# Altium PCB PCB-MAIN.PcbDoc (part 3 of 6)
Units mm, origin at the board's own origin, x right, y up, seen from the top; angles counter-clockwise.
Board outline 110 x 75 mm, 8 copper layers (F.Cu, In1.Cu, In2.Cu, In3.Cu, In4.Cu, In5.Cu, In6.Cu, B.Cu); 251 components, 185 nets, 1143 pads, 853 vias.
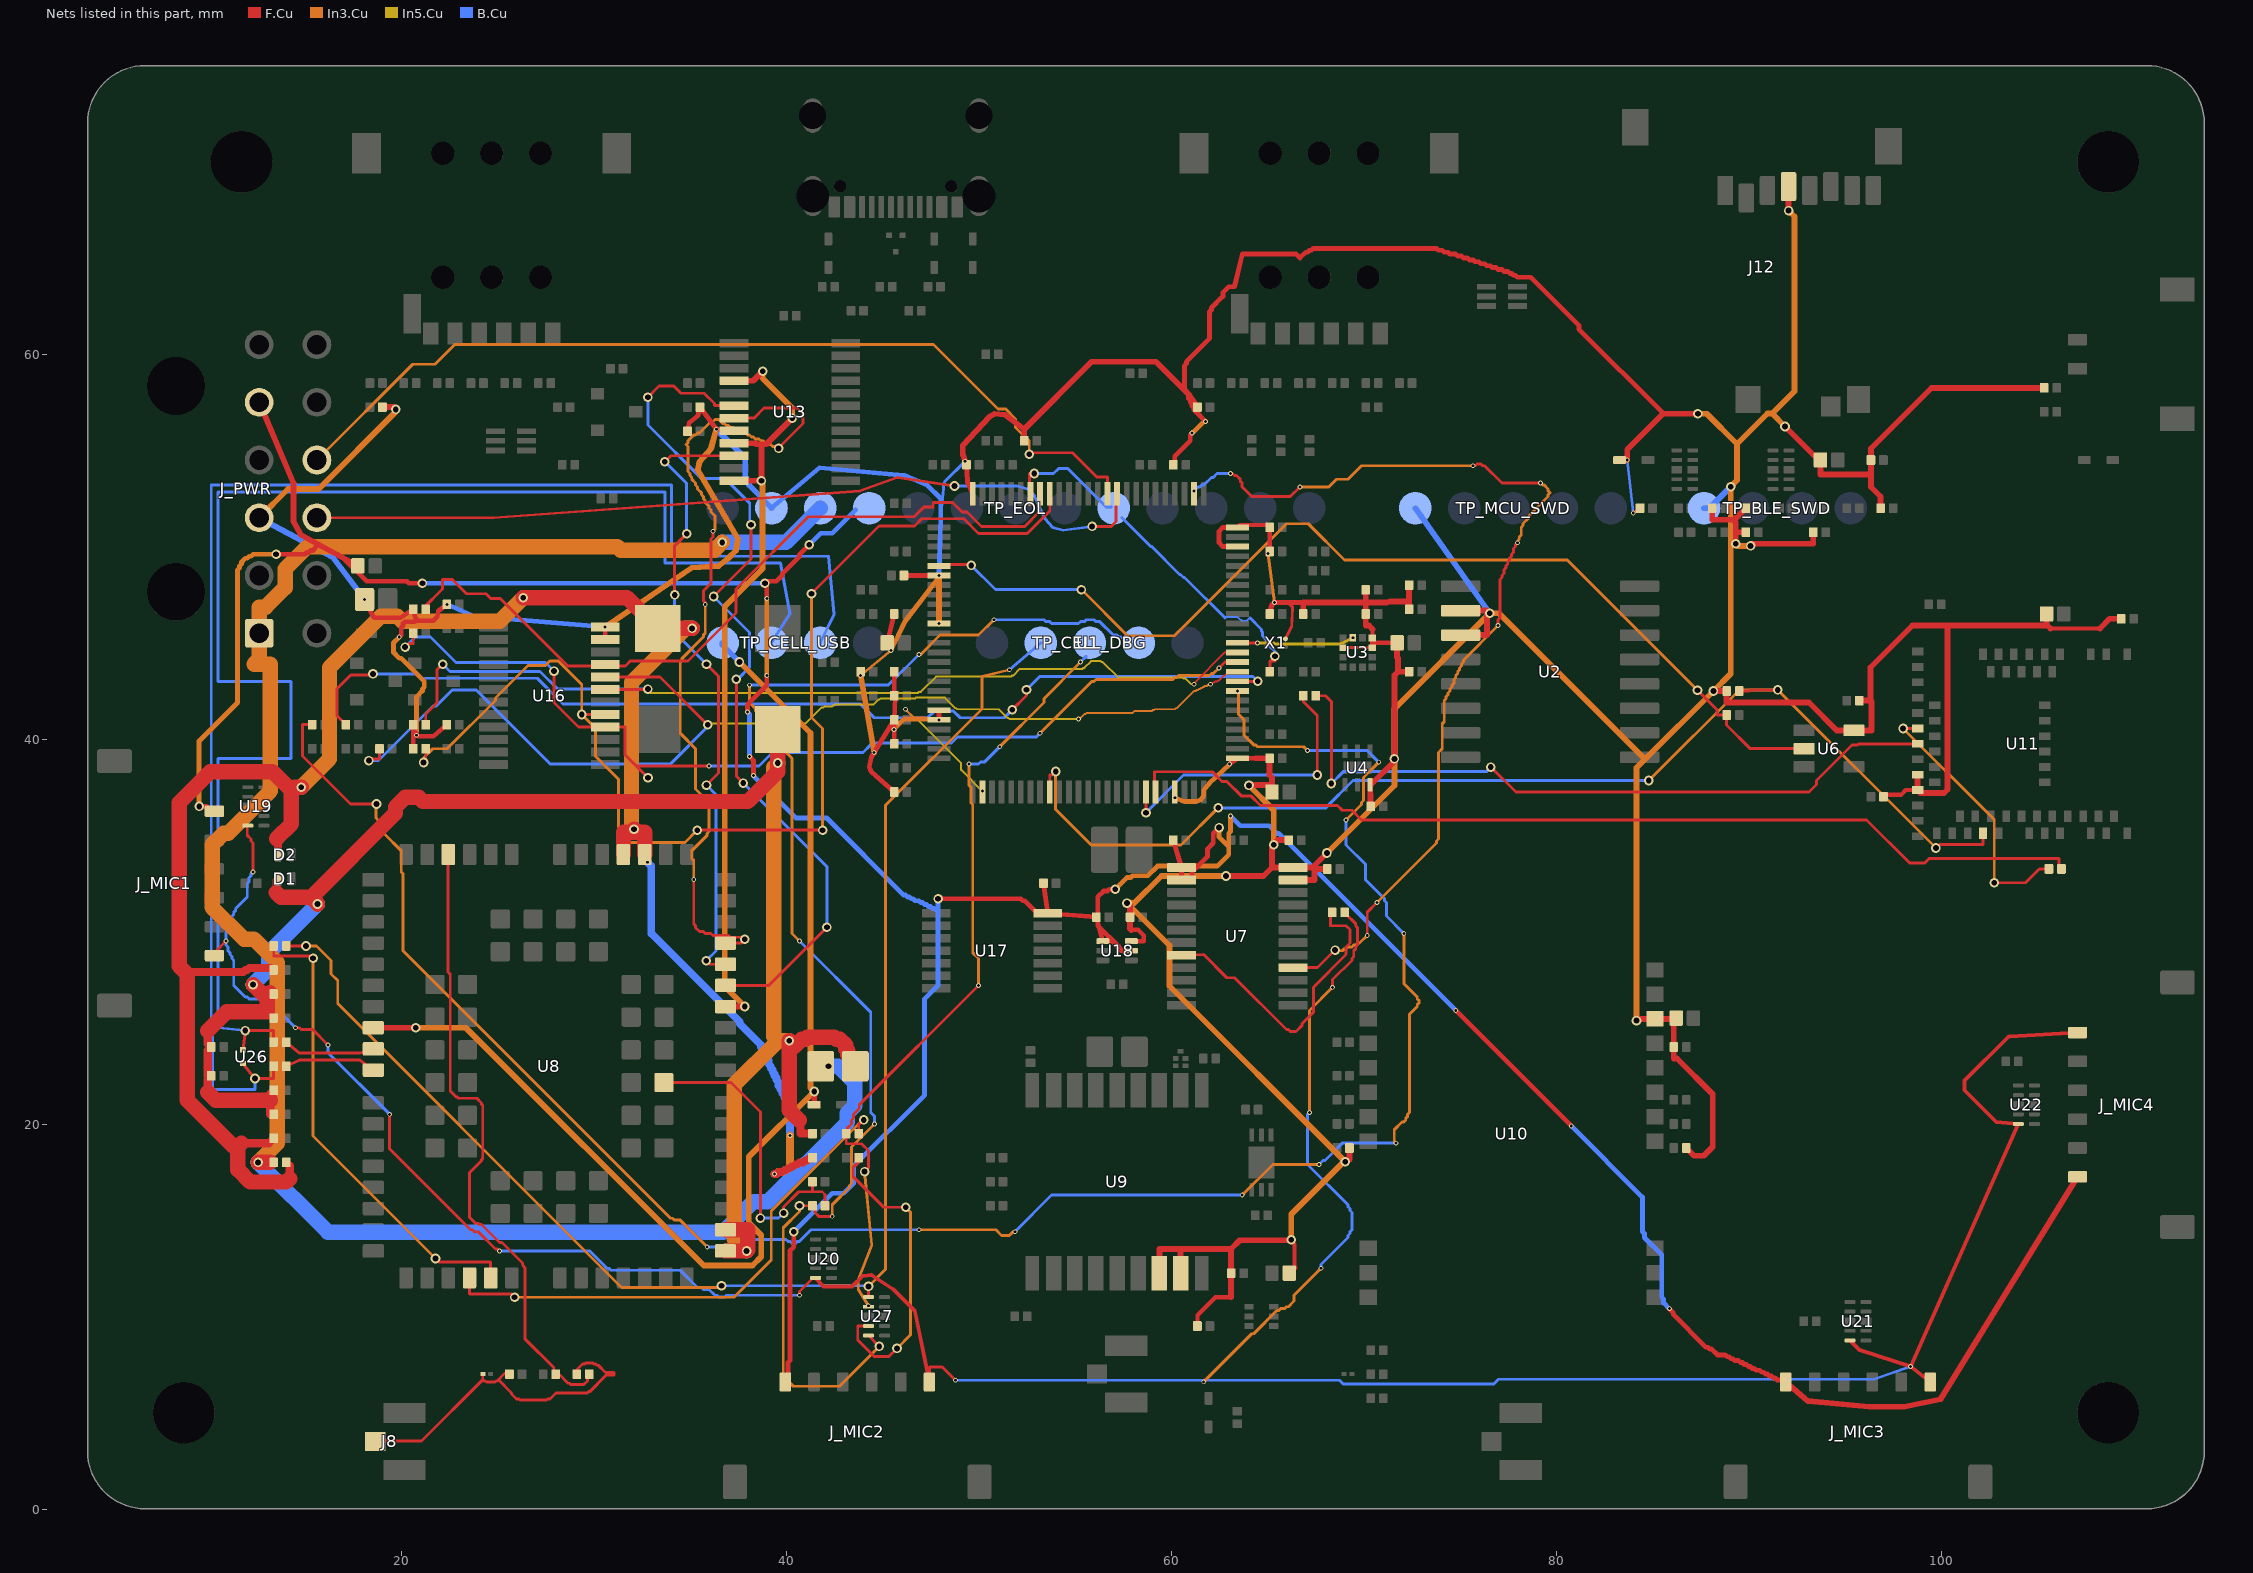
[diagram p8: the nets of this part, all layers, seen from the top]

## Via types
v1: diameter 0.5, hole 0.3, F.Cu to B.Cu, tented both sides, 579 vias
v2: diameter 0.25, hole 0.15, F.Cu to B.Cu, tented both sides, 274 vias

## Nets (pads, with @x,y where several pads share a name; then routed paths per layer and width w, separated by ;. In a path a pad name is that pad's centre, name@x,y a point inside that pad or via, vN(x,y) a via of type N, cw(c..) or ccw(c..) an arc to the next point about the centre after c; other vN are vias at no path point)
1V8_MIC: C20.1 C27.1 C30.1 C31.1 J_MIC1.1 J_MIC2.1 J_MIC3.1 J_MIC4.1 J_PWR.5 TP_EOL.4 U7.1 U7.2 U17.14 U18.1 U18.5 | length 207.4
  F.Cu w0.25: v1(9.485,36.525) 9.885,36.525 J_MIC1.1@9.985,36.425 ; v1(13.485,49.625) 14.985,49.625 15.085,49.725 15.185,49.725 15.285,49.825 15.385,49.825 15.685,50.125 ; 16.985,49.425 18.185,48.225 20.285,48.225 20.385,48.125 v1(21.085,48.125) ; v2(37.985,41.425) 37.985,41.825 38.985,42.825 v2(38.985,43.325) ; v2(38.085,39.125) 38.285,38.925 v2(38.285,38.125) ; v1(38.885,48.125) v1@38.985,48.225 ; v2(38.985,47.325) v1@38.985,48.225 ; J_MIC2.1@40.085,6.925 40.085,7.625 40.185,7.725 40.185,13.425 40.385,13.625 v1(40.385,14.425) ; v1(41.185,50.125) 40.685,49.625 40.685,49.525 39.785,48.625 39.785,48.525 39.485,48.225 v1@38.985,48.225 ; v1(47.885,31.725) 52.185,31.725 52.285,31.625 52.385,31.625 U17.14@52.985,31.025 ; C30.1@53.36,32.525 U17.14@53.585,30.975 C31.1@56.11,30.775 U18.1@56.445,29.525 56.945,29.525 57.445,29.025 U18.5@57.925,29.025 ; v1(57.085,32.225) 56.785,32.225 56.685,32.125 56.485,32.125 56.185,31.825 56.185,30.325 57.285,29.225 57.285,29.125 57.385,29.025 57.485,29.025 ; C27.1@60.11,34.775 U7.1@60.535,33.35 U7.2@60.535,32.7 ; U7.2@61.085,32.725 61.085,33.125 61.885,33.925 61.885,34.325 62.185,34.625 62.185,35.125 v1(62.485,35.425) ; v2(74.785,25.925) v2(80.785,19.925) ; v2(85.885,10.425) 86.085,10.225 86.085,10.125 87.785,8.425 87.885,8.425 87.985,8.325 88.085,8.325 88.385,8.025 88.785,8.025 88.885,7.925 88.985,7.925 89.085,7.825 89.185,7.825 89.285,7.725 89.485,7.725 89.585,7.625 89.685,7.625 89.785,7.525 89.885,7.525 89.985,7.425 90.085,7.425 90.185,7.325 90.285,7.325 90.385,7.225 90.585,7.225 90.685,7.125 90.785,7.125 90.885,7.025 90.985,7.025 91.085,6.925 91.185,6.925 91.285,6.825 91.385,6.825 91.485,6.725 91.685,6.725 J_MIC3.1@91.785,6.625
  F.Cu w0.3: J_PWR.5@12.605,57.525 14.385,53.325 14.385,51.325 14.785,50.625 C20.1@17.735,49.025 ; J_MIC3.1@91.935,6.615 93.085,5.625 96.285,5.325 98.085,5.325 99.985,5.725 J_MIC4.1@107.095,17.275
  In3.Cu w0.25: v1(9.485,36.525) 9.485,39.925 11.485,41.925 11.485,48.825 11.585,48.925 11.585,49.025 11.685,49.125 11.685,49.225 11.885,49.425 11.985,49.425 12.085,49.525 12.185,49.525 12.285,49.625 v1(13.485,49.625) ; v2(38.985,43.325) v2(38.985,47.325) ; v1(57.085,32.225) 57.685,32.825 57.885,32.825 57.985,32.925 58.785,32.925 59.285,33.425 62.385,33.425 62.985,34.025 62.985,34.425 ; v1(62.485,35.425) 62.485,34.925 62.985,34.425 ; v2(63.085,36.025) 63.085,35.225 62.985,35.125 62.985,34.425
  B.Cu w0.25: v1(21.085,48.125) v1(38.885,48.125) ; v2(37.985,41.425) 38.085,41.325 v2(38.085,39.125) ; v2(38.285,38.125) 40.485,35.925 42.085,35.925 46.085,31.925 46.185,31.925 46.285,31.825 46.385,31.825 46.485,31.725 46.585,31.725 46.685,31.625 46.885,31.625 46.985,31.525 47.085,31.525 47.185,31.425 47.285,31.425 47.385,31.325 47.485,31.325 47.585,31.225 47.685,31.225 47.785,31.125 47.885,31.125 ; v1(40.385,14.425) 42.385,16.425 42.985,16.425 43.485,16.925 43.485,17.825 47.185,21.525 47.185,26.525 47.885,27.225 v1(47.885,31.725) ; v1(41.185,50.125) 41.785,50.725 42.385,50.725 TP_EOL.4@43.585,51.925 ; v2(63.085,36.025) 63.585,35.525 65.085,35.525 65.485,35.125 65.585,35.125 v2(74.785,25.925) ; v2(80.785,19.925) 84.485,16.225 84.485,14.425 84.585,14.325 84.585,14.125 85.485,13.225 85.485,11.025 85.585,10.925 85.585,10.725 v2(85.885,10.425)
3V3_DIGITAL: C1.1 C2.1 C3.1 C4.1 C5.1 C6.1 C7.1 C8.1 C9.1 C10.1 C11.1 C12.1 C13.1 C19.1 C21.1 C22.1 C23.1 C24.1 C25.1 C26.1 C28.1 C29.1 C32.1 C34.1 C35.1 C49.1 C60.1 C61.1 C62.1 C66.1 C67.1 C71.1 C72.1 C73.1 C74.1 C75.1 D11.1 J12.4 J_PWR.3 R1.1 R4.1 R6.1 R7.1 R13.1 R14.1 R28.1 R32.1 R33.1 R44.1 R48.1 R49.1 R67.1 R68.1 R76.1 R78.1 R85.1 R86.1 R87.1 R88.1 R89.1 R90.1 R99.1 TP_BLE_SWD.1 TP_EOL.2 TP_MCU_SWD.1 U1.6 U1.11 U1.20 U1.21 U1.27 U1.47 U1.51 U1.73 U1.75 U1.100 U2.2 U2.3 U3.2 U3.9 U3.10 U4.3 U6.5 U7.23 U7.24 U9.7 U9.8 U10.9 U11.28 U11.30 U13.8 U16.23 U16.24 U18.6 X1.3 | length 470.8
  F.Cu w0.15: v2(43.86,43.325) R14.1@43.86,43.525 ; C6.1@45.235,45.025 v2(45.435,44.625) ; R1.1@65.11,46.525 65.31,47.025 65.41,47.075 66.11,47.075 66.31,46.875 66.26,45.875 X1.3@65.935,45.23 ; U3.2@68.922,44.775 U3.9@70.447,44.775 ; v2(84.01,51.775) R90.1@84.36,52.025
  F.Cu w0.225: U18.6@57.925,29.525 58.575,29.525 58.575,29.817 58.282,30.11 57.925,30.11 ; C62.1@61.36,9.525 61.36,10.09 62.295,11.025 63.11,11.025 ; U1.51@63.435,39.025 64.349,39.025 64.387,39.025 ; U1.75@63.435,51.025 63.56,51.15 64.985,51.15 C4.1@65.11,51.025 65.11,50.34 C12.1@65.11,49.775 ; v1@66.207,13.978 66.407,13.777 C61.1@66.407,12.548 ; v1@66.219,14.002 v1(66.231,14.002) ; U3.9@70.447,44.775 70.447,45.025 ; 70.46,45.737 70.46,45.288 U3.10@70.447,45.275 70.447,45.025 ; 71.2,47.124 71.31,47.124 71.36,47.175 ; C24.1@71.735,45.025 70.447,45.025 ; R78.1@97.01,37.125 97.921,37.125 98.171,37.375 U11.30@98.785,37.375 ; 105.684,45.774 108.26,45.774
  F.Cu w0.25: v2(18.085,47.275) 18.535,46.375 18.635,46.325 19.935,46.325 R32.1@20.61,46.775 20.71,46.325 20.86,46.175 ; v2(19.885,45.325) 19.985,45.425 19.985,45.825 20.085,45.925 20.085,46.025 20.185,46.125 20.685,46.125 20.785,46.225 20.86,46.175 ; R28.1@20.61,39.525 R33.1@20.61,40.775 20.66,40.425 ; v2(20.785,40.225) 20.785,40.325 20.66,40.425 ; C35.1@22.36,40.775 21.66,40.175 20.86,40.175 20.66,40.425 ; v2(22.36,47.025) 21.91,46.675 21.86,46.375 21.66,46.175 20.86,46.175 ; U16.23@30.585,45.2 v2(30.585,45.85) ; C49.1@34.86,56.025 34.96,56.475 35.41,56.825 R44.1@35.51,57.275 v2(36.36,56.125) U13.8@37.285,56.05 ; C6.1@45.235,45.025 C1.1@45.61,46.525 ; v2(45.585,40.525) C8.1@45.61,41.025 ; C2.1@45.61,37.275 44.41,38.325 44.31,38.575 44.41,39.075 C8.1@45.61,41.025 ; C10.1@45.61,39.775 C8.1@45.61,41.025 ; C11.1@45.61,43.525 C9.1@45.61,42.275 45.66,42.225 C8.1@45.61,41.025 ; C7.1@46.11,48.525 v2(47.935,48.525) ; v2(47.935,41.025) U1.20@47.935,41.525 ; C5.1@49.36,54.275 49.41,53.425 U1.100@49.685,52.775 ; R4.1@60.185,54.325 60.185,54.725 60.985,55.525 60.985,55.825 v2(61.085,55.925) ; R49.1@61.285,57.425 R49.1@61.285,57.025 ; v2(61.785,56.525) R49.1@61.285,57.025 ; v2(63.035,38.725) U1.51@63.435,39.025 ; U1.73@63.435,50.025 62.685,50.025 62.485,50.225 62.485,50.825 62.685,51.025 U1.75@63.435,51.025 ; v2(65.035,49.675) C12.1@65.11,49.775 ; R1.1@65.11,46.525 65.21,46.977 v2(65.36,47.127) 66.86,47.127 ; 85.585,56.925 81.185,61.325 81.185,61.525 78.685,64.025 77.985,64.025 77.885,64.125 77.785,64.125 77.685,64.225 77.585,64.225 77.485,64.325 77.285,64.325 77.185,64.425 76.985,64.425 76.885,64.525 76.685,64.525 76.585,64.625 76.385,64.625 76.285,64.725 76.085,64.725 75.985,64.825 75.785,64.825 75.685,64.925 75.485,64.925 75.385,65.025 75.185,65.025 75.085,65.125 74.885,65.125 74.785,65.225 74.485,65.225 74.385,65.325 74.185,65.325 74.085,65.425 73.885,65.425 73.785,65.525 67.385,65.525 67.285,65.425 67.185,65.425 67.085,65.325 66.985,65.325 66.685,65.025 66.485,65.225 63.685,65.225 63.285,63.525 62.985,63.525 62.685,63.225 62.685,63.025 62.085,62.425 62.085,62.325 61.985,62.225 61.985,60.825 60.785,59.625 60.785,59.525 60.685,59.425 60.685,58.225 60.785,58.125 60.785,58.025 60.885,57.925 60.885,57.725 60.985,57.625 60.985,57.525 61.085,57.425 61.085,57.325 61.185,57.225 61.185,57.125 R49.1@61.285,57.025
  F.Cu w0.3: R48.1@19.01,57.275 19.587,57.275 v1(19.704,57.158) ; C5.1@49.36,54.275 49.16,54.827 49.16,55.277 50.56,56.777 50.81,56.927 51.36,56.877 52.36,56.127 ; R6.1@52.36,55.525 52.36,56.127 ; v1(57.698,31.503) 57.825,31.377 57.86,31.377 C32.1@57.86,30.775 57.86,30.173 57.861,30.173 57.925,30.11 ; U9.7@59.385,12.275 59.385,13.527 60.485,13.527 ; U9.8@60.485,12.275 60.485,13.527 ; R49.1@61.36,57.275 60.955,57.877 59.205,59.627 55.86,59.627 52.36,56.127 ; v1(62.845,32.912) 64.795,32.912 65.233,33.35 ; 63.11,11.025 C60.1@63.11,12.275 63.11,13.527 ; v1(64.041,37.616) 64.062,37.638 C13.1@65.235,37.638 ; 64.387,39.025 64.533,39.025 C3.1@65.11,39.025 65.11,38.152 65.235,38.027 C13.1@65.235,37.638 ; C13.1@65.235,37.275 C13.1@65.235,37.638 ; C28.1@66.11,34.775 65.533,34.775 65.329,34.571 v1(65.329,34.533) 65.233,34.437 65.233,33.35 ; C61.1@66.135,12.275 C61.1@66.407,12.548 ; v1@66.219,14.002 66.207,13.99 66.207,13.978 63.561,13.978 63.11,13.527 ; U7.23@66.335,32.7 67.437,32.7 67.437,33.275 ; R13.1@66.86,46.525 66.86,47.127 70.11,47.127 ; v1(68.089,34.104) 67.335,33.351 ; C29.1@68.11,33.275 67.437,33.275 ; v1(69.042,18.059) 69.156,18.173 69.26,18.173 R67.1@69.26,18.775 ; C25.1@70.11,47.775 70.11,47.127 ; C26.1@70.36,36.525 70.36,37.127 70.335,37.152 U4.3@70.335,37.66 70.386,37.66 71.595,38.869 v1(71.595,38.995) 71.595,43.337 71.783,43.525 ; 70.46,45.737 70.274,45.923 70.11,45.923 C23.1@70.11,46.525 70.11,47.127 ; 71.2,47.124 71.197,47.127 70.11,47.127 ; 71.36,47.175 72.36,47.175 ; C24.1@71.735,45.025 71.735,44.273 71.783,44.225 71.783,43.525 ; R7.1@72.36,43.525 71.783,43.525 ; C21.1@72.36,46.775 72.36,47.175 ; C22.1@72.36,48.025 72.36,47.175 ; U2.3@75.035,45.43 76.412,45.43 v1@76.412,46.7 ; U2.2@75.035,46.7 v1@76.412,46.7 ; v1(76.555,46.56) 76.552,46.56 v1@76.412,46.7 ; D11.1@83.295,54.525 v2(83.695,54.525) 83.695,55.077 85.553,56.935 v1(87.368,56.935) ; v1(84.178,25.397) 84.245,25.397 84.333,25.485 U10.9@85.135,25.485 C67.1@85.937,25.485 ; C67.1@86.235,25.525 85.977,25.525 C67.1@85.937,25.485 ; R68.1@86.76,18.775 87.162,18.373 87.672,18.373 88.143,18.844 88.143,21.564 86.284,23.423 86.11,23.423 C66.1@86.11,24.025 86.11,25.312 C67.1@85.937,25.485 ; R86.1@88.11,52.025 88.11,51.423 89.206,51.423 89.232,51.397 ; v1(88.173,42.525) 88.283,42.525 R76.1@88.86,42.525 88.86,41.923 93.135,41.923 94.583,40.475 U6.5@95.485,40.475 96.387,40.475 96.387,41.975 96.337,42.025 ; v1(89.335,50.172) 89.337,50.174 89.337,50.775 ; R87.1@89.86,50.775 89.337,50.775 ; R89.1@89.86,52.025 89.232,51.397 ; v1(90.105,50.062) 90.216,50.173 93.36,50.173 R88.1@93.36,50.775 ; v1(91.894,56.268) 93.636,54.525 C75.1@93.735,54.525 93.735,53.773 96.36,53.773 ; v1(92.08,67.486) J12.4@92.08,68.735 ; C73.1@95.76,42.025 96.337,42.025 ; R85.1@96.86,52.025 96.86,52.627 96.36,53.127 96.36,53.773 ; R78.1@97.01,37.025 R78.1@97.01,37.125 ; U11.28@98.785,38.175 U11.30@98.785,37.375 98.937,37.223 100.159,37.223 100.337,37.402 100.337,45.923 ; R99.1@105.36,58.275 99.508,58.275 96.36,55.127 C74.1@96.36,54.525 96.36,53.773 ; C72.1@105.485,46.525 105.485,45.923 ; 105.684,45.774 105.536,45.923 105.485,45.923 ; 108.26,45.774 108.761,46.275 C71.1@109.36,46.275 ; 60.485,13.527 63.11,13.527 ; 65.233,33.35 U7.24@66.335,33.35 67.261,33.35 67.335,33.35 ; 67.335,33.35 67.437,33.35 67.437,33.275 ; 89.232,51.397 89.337,51.293 89.337,50.775 ; 96.337,42.025 96.337,43.741 98.518,45.923 100.337,45.923 ; 100.337,45.923 105.485,45.923
  In3.Cu w0.1: v2(46.185,41.575) 46.685,41.075
  In3.Cu w0.15: v2(43.86,43.325) v2(45.435,44.625) ; v2(65.035,49.675) v2(65.36,47.127)
  In3.Cu w0.25: v2(19.885,45.325) 19.585,45.025 19.585,44.525 19.885,44.225 19.985,44.225 21.185,43.025 21.185,42.725 21.085,42.625 21.085,42.525 20.785,42.225 v2(20.785,40.225) ; v2(45.435,44.625) 46.185,46.175 47.885,48.375 v2(47.935,48.525) ; v2(45.585,40.525) 46.135,41.075 46.335,41.075 47.235,41.075 v2(47.935,41.025) ; v2(60.185,36.975) 60.685,36.775 61.285,36.775 61.535,36.875 61.685,37.075 61.685,37.375 61.985,37.725 v2(63.035,38.725) ; v2(61.085,55.925) 61.685,56.525 v2(61.785,56.525)
  In3.Cu w0.3: J_PWR.3@12.605,51.525 14.105,53.025 15.696,53.025 19.704,57.034 v1(19.704,57.158) ; v2(30.585,45.85) 35.085,48.925 36.485,49.025 36.985,49.425 37.385,49.825 37.485,50.425 35.385,54.025 35.485,54.425 36.085,55.125 v2(36.36,56.125) ; v2(43.86,43.325) v2(44.562,39.322) ; v2(47.935,46.025) v2(47.935,48.525) ; v1(62.845,32.912) 59.488,32.912 58.079,31.503 v1(57.698,31.503) 59.91,29.291 59.91,27.188 68.96,18.138 v1@68.96,18.059 ; v1(64.041,37.616) 65.329,36.327 v1(65.329,34.533) ; v1(66.231,14.002) 66.231,15.33 v1@68.96,18.059 ; v1(68.089,34.104) 71.595,37.611 v1(71.595,38.995) 71.595,41.6 v1(76.555,46.56) 77.03,46.56 84.619,38.971 ; v1(69.042,18.059) v1@68.96,18.059 ; v1(84.178,25.397) 84.178,38.53 84.619,38.971 ; v1(87.368,56.935) 87.826,56.935 89.405,55.356 ; v1(90.105,50.062) 89.445,50.062 v1(89.335,50.172) 89.072,50.172 ; v1(91.894,56.268) 91.225,56.936 ; v1(92.08,67.486) 92.391,67.175 92.391,58.102 91.225,56.936 ; 84.619,38.971 v1(88.173,42.525) 89.072,43.424 89.072,50.172 ; 89.072,50.172 v1(89.072,53.139) 89.405,53.472 89.405,55.356 ; 89.405,55.356 90.986,56.936 91.225,56.936
  In5.Cu w0.1: v2(46.185,41.575) 46.735,41.025 46.835,41.025 49.085,38.775 49.085,38.425 v2(50.185,37.325)
  B.Cu w0.15: 48.025,51.525 48.185,53.325 48.235,53.425 v2(49.292,54.463) ; v2(83.695,54.525) v2(84.01,51.775)
  B.Cu w0.25: v2(22.36,47.025) 23.685,46.425 v2(30.585,45.85) ; TP_EOL.2@39.225,52.025 41.725,54.125 46.125,53.725 47.325,53.225 48.025,52.525 48.025,51.525 v2(47.935,48.525)
  B.Cu w0.3: J_PWR.3@12.605,51.525 16.435,49.475 v2(18.085,47.275) ; v2(36.36,56.125) 37.86,54.625 37.86,53.625 38.06,53.425 38.06,53.225 TP_EOL.2@39.225,52.025 ; TP_MCU_SWD.1@72.685,52.025 v1(76.555,46.56) ; TP_BLE_SWD.1@87.685,52.025 87.958,52.025 v1(89.072,53.139)
3V8_MODEM: FB1.1 J_PWR.1 R42.1 TP_EOL.3 | length 104.5
  F.Cu w0.4: R42.1@13.183,18.025 R42.1@13.36,18.025
  F.Cu w0.8: v1(12.549,18.025) R42.1@13.183,18.025
  In3.Cu w0.8: v1(12.549,18.025) 13.553,19.03 13.553,28.408 12.329,29.632 11.814,29.632 10.165,31.282 10.165,34.534 10.753,35.123 10.996,35.123 12.347,36.474 13.185,37.325 13.185,43.915 12.347,43.915 12.605,44.172 J_PWR.1@12.605,45.525 12.605,46.878 12.943,46.878 13.958,47.892 13.958,48.862 15.12,50.025 31.215,50.025 31.395,49.845 36.268,49.845 v1(36.666,50.243)
  B.Cu w0.8: v1(12.549,18.025) 16.173,14.401 36.714,14.401 38.299,15.986 39.039,15.986 43.165,20.112 43.165,20.589 43.555,20.979 43.555,22.156 42.685,23.025 v1(42.185,23.025) ; v1(36.666,50.243) 39.983,50.243 TP_EOL.3@41.765,52.025
3V8_MODEM_BB: C36.1 C37.1 C38.1 C39.1 C40.1 C41.1 C42.1 C43.1 D1.1 FB1.2 U8.32 U8.33 | length 93
  F.Cu w0.4: C37.1@9.934,22.35 C37.1@10.11,22.525 C37.1@9.935,22.525 ; C38.1@9.934,23.85 C38.1@10.11,24.025 C38.1@9.934,24.201 ; 13.022,25.863 C40.1@13.36,25.525 ; C39.1@13.184,21.6 C39.1@13.36,21.775 ; C41.1@13.185,20.525 C41.1@13.36,20.525 ; C43.1@13.227,26.775 C43.1@13.36,26.775 ; 40.661,20.224 40.733,20.152 40.733,19.525 C42.1@41.36,19.525
  F.Cu w0.401: 13.484,32.053 13.484,32.674 D1.1@13.585,32.775
  F.Cu w0.45: 9.934,21.673 C37.1@9.934,22.35 ; C37.1@9.934,22.525 C38.1@9.934,23.85 ; C38.1@9.934,24.201 9.934,24.877 ; C43.1@13.152,26.85 C43.1@13.227,26.775 ; C41.1@13.184,20.525 13.184,21.264 C39.1@13.184,21.6
  F.Cu w0.8: 9.934,21.673 10.343,21.264 13.184,21.264 ; 9.934,24.877 10.921,25.863 13.022,25.863 13.022,26.726 ; v1(12.283,27.268) 12.825,26.726 13.022,26.726 ; C43.1@13.152,26.85 13.028,26.726 13.022,26.726 ; 13.484,32.053 13.74,31.798 15.31,31.798 ; v1(15.636,31.451) 15.636,31.472 15.31,31.798 ; U8.32@36.835,13.425 v1(37.935,13.425) 37.987,13.477 37.987,14.525 U8.33@36.835,14.525 ; C36.1@39.555,40.525 v1(39.557,38.779) ; v1(39.557,38.779) v1(39.557,38.779) ; v1(40.145,24.346) 40.145,20.74 40.661,20.224 ; 40.385,24.025 40.785,24.425 40.985,24.425 41.085,24.525 42.485,24.525 42.585,24.425 42.785,24.425 43.085,24.125 43.085,23.925 43.185,23.825 FB1.2@43.185,23.625 ; 15.31,31.798 19.687,36.175 19.687,36.495 20.186,36.994 20.891,36.994 21.105,36.78 38.007,36.78 39.555,38.328 v1(39.557,38.779)
  In3.Cu w0.8: v1(37.935,13.425) 37.298,14.062 37.298,22.087 39.557,24.346 ; v1(39.557,38.779) 39.336,38.558 39.336,24.567 39.557,24.346 ; v1(40.145,24.346) 39.557,24.346
  B.Cu w0.8: v1(12.283,27.268) 13.088,28.072 13.088,28.901 v1(15.636,31.451) v1(15.636,31.451)
3V8_MODEM_RF: C44.1 C45.1 C46.1 C47.1 D2.1 R42.2 U8.52 U8.53 | length 107.6
  F.Cu w0.4: 9.085,27.925 11.785,27.925 11.885,28.025 11.985,28.025 12.085,28.125 13.185,28.125 C47.1@13.285,28.025 ; 13.11,19.025 C45.1@13.36,19.275 ; R42.2@14.01,18.025 R42.2@14.185,17.85 ; v2(39.385,17.425) 39.485,17.425 39.585,17.525 39.785,17.525 39.885,17.625 39.985,17.625 40.085,17.725 40.185,17.725 40.285,17.825 40.385,17.825 40.485,17.925 40.585,17.925 40.685,18.025 40.885,18.025 40.985,18.125 41.085,18.125 41.185,18.225 C46.1@41.285,18.225
  F.Cu w0.401: 13.511,34.851 13.585,34.777 D2.1@13.585,34.025
  F.Cu w0.45: 11.685,19.025 13.11,19.025 ; 14.185,17.173 R42.2@14.185,17.85
  F.Cu w0.8: 11.685,19.025 11.496,18.836 ; 13.511,34.851 14.275,35.615 14.275,37.351 ; 14.185,17.173 14.019,17.007 12.139,17.007 11.496,17.65 11.496,18.836 ; v1(14.795,37.527) 14.451,37.527 14.275,37.351 ; v1(26.328,47.373) 31.717,47.373 C44.1@33.315,45.775 v1(35.102,45.775) ; U8.53@31.535,34.025 31.535,35.177 v1@32.085,35.177 ; v1(32.085,35.338) v1@32.085,35.177 ; U8.52@32.635,34.025 32.635,35.177 v1@32.085,35.177 ; 11.496,18.836 11.295,18.836 8.876,21.255 8.876,27.802 8.445,28.233 8.445,36.708 10.071,38.335 13.291,38.335 14.275,37.351
  In3.Cu w0.4: v2(39.385,17.425) 39.485,17.425 39.585,17.525 39.785,17.525 39.885,17.625 39.985,17.625 40.185,17.825 v2(40.185,19.425)
  In3.Cu w0.8: v1(14.795,37.527) 16.26,38.992 16.26,43.746 18.926,46.412 19.778,46.412 20.038,46.153 25.108,46.153 v1(26.328,47.373) ; v1(32.085,35.338) 31.954,35.469 31.954,38.395 31.953,38.397 31.953,42.975 34.753,45.775 v1(35.102,45.775)
  B.Cu w0.4: v2(32.785,33.625) 32.985,33.425 32.985,29.925 37.585,25.325 37.585,25.225 38.685,24.125 38.685,24.025 38.785,23.925 38.785,23.825 38.885,23.725 38.885,23.625 38.985,23.525 38.985,23.425 39.085,23.325 39.085,23.125 39.185,23.025 39.185,22.925 39.285,22.825 39.285,22.725 39.385,22.625 39.385,22.525 39.485,22.425 39.485,22.325 39.585,22.225 39.585,22.025 39.685,21.925 39.685,21.825 39.785,21.725 39.785,21.625 39.885,21.525 39.885,21.425 39.985,21.325 39.985,21.225 40.085,21.125 40.085,20.925 40.185,20.825 v2(40.185,19.425)
AAD_CFG: U1.77 U7.16 | length 52.4
  F.Cu w0.15: v2(63.085,53.825) 63.185,53.825 63.285,53.725 63.385,53.725 63.585,53.525 63.585,53.425 63.685,53.325 63.685,53.125 64.185,52.625 66.185,52.625 v2(66.685,53.125) ; U7.16@66.335,28.15 67.604,28.15 v1(68.513,29.059) ; v2(70.185,29.825) 70.185,31.025 v2(70.685,31.525) ; v2(75.685,54.225) 75.785,54.225 75.885,54.325 76.085,54.325 76.185,54.225 76.285,54.225 77.185,53.325 v2(79.185,53.325) ; v2(76.985,45.925) 76.985,46.225 77.085,46.325 77.085,48.325 77.185,48.425 77.185,48.525 77.285,48.625 77.285,48.825 77.385,48.925 77.385,49.025 77.485,49.125 77.485,49.225 77.585,49.325 77.585,49.425 77.685,49.525 77.685,49.625 77.785,49.725 77.785,49.925 77.885,50.025 77.885,50.125 v2(77.985,50.225)
  In3.Cu w0.15: v2(66.685,53.125) 68.185,53.125 68.585,53.525 69.185,53.525 69.885,54.225 v2(75.685,54.225) ; v1@68.585,29.025 68.885,29.025 68.985,29.125 69.085,29.125 69.185,29.225 69.385,29.225 69.485,29.325 69.585,29.325 69.685,29.425 69.785,29.425 v2(70.185,29.825) ; v2(70.685,31.525) 73.785,34.625 73.785,34.725 73.885,34.825 73.885,39.325 74.085,39.525 74.085,40.825 74.185,40.925 74.185,42.025 74.285,42.125 74.285,42.225 74.385,42.325 74.385,42.425 74.485,42.525 74.485,42.625 74.585,42.725 74.585,42.825 74.685,42.925 74.685,43.125 74.785,43.225 74.785,43.325 74.885,43.425 74.885,43.525 74.985,43.625 74.985,43.725 75.085,43.825 75.085,43.925 75.185,44.025 75.185,44.125 v2(76.985,45.925) ; v2(77.985,50.225) 77.985,50.325 78.085,50.425 78.085,50.525 78.185,50.625 78.185,51.025 78.285,51.125 78.285,51.225 78.585,51.525 78.585,51.625 79.585,52.625 79.585,52.725 79.685,52.825 79.585,52.925 79.585,53.025 79.385,53.225 79.285,53.225 v2(79.185,53.325)
  B.Cu w0.15: v2(61.185,52.925) 61.385,53.125 61.485,53.125 61.585,53.225 61.685,53.225 62.085,53.625 62.185,53.625 62.385,53.825 v2(63.085,53.825)
AAD_CFG_1V8_FANOUT: J_MIC1.6 J_MIC2.6 J_MIC3.6 J_MIC4.6 R18.2 U19.5 U20.5 U21.5 U22.5 | length 170.6
  F.Cu w0.15: J_MIC1.6@10.385,28.925 10.385,29.025 v2(10.885,29.525) ; U19.5@11.985,35.525 11.985,35.025 12.185,34.825 12.185,34.725 12.285,34.625 v2(12.285,33.125) ; v2(14.485,25.025) 14.685,25.025 14.785,24.925 15.385,24.925 v2(16.185,24.125) ; v2(19.385,20.525) 19.385,18.725 23.585,14.525 23.685,14.525 23.785,14.425 23.985,14.425 24.885,13.525 24.985,13.525 v2(25.085,13.425) ; v2(40.685,11.125) 40.685,11.325 U20.5@41.385,12.025 ; J_MIC2.6@47.435,6.615 47.435,7.392 48.096,7.392 v2(48.783,6.705) ; v2(68.385,27.125) 68.385,27.525 69.385,28.525 69.385,28.625 69.485,28.725 69.485,29.025 69.585,29.125 69.585,29.225 69.685,29.325 69.685,30.225 69.585,30.325 69.585,30.425 R18.2@69.085,30.925
  F.Cu w0.2: U20.5@41.517,12.025 41.917,11.575 43.418,11.575 43.967,12.125 44.417,12.175 45.567,11.425 46.667,10.325 J_MIC2.6@47.435,6.615 ; U21.5@95.267,8.775 95.767,8.275 v2(98.417,7.425) ; J_MIC3.6@99.435,6.615 v2(98.417,7.425) ; J_MIC4.6@107.095,24.775 103.567,24.575 103.467,24.525 101.217,22.275 101.217,21.775 102.867,20.125 U22.5@104.017,20.025 v2(98.417,7.425)
  In3.Cu w0.15: v2(61.685,6.625) 64.185,9.125 64.285,9.125 65.485,10.325 65.585,10.325 65.685,10.425 65.885,10.425 65.985,10.525 66.085,10.525 66.385,10.825 66.385,11.125 v2(67.785,12.525) ; v2(67.185,20.625) 67.185,25.925 v2(68.385,27.125)
  B.Cu w0.15: v2(12.285,33.125) 12.185,33.025 12.185,32.925 12.085,32.825 12.085,32.625 11.985,32.525 11.985,31.825 11.385,31.225 11.385,31.125 11.285,31.025 11.285,30.925 11.185,30.825 11.185,30.725 11.085,30.625 11.085,30.425 10.985,30.325 10.985,30.225 10.885,30.125 v2(10.885,29.525) 10.885,29.325 10.985,29.225 10.985,29.025 11.085,28.925 11.085,28.825 11.185,28.725 11.185,28.625 11.285,28.525 11.285,27.225 11.885,26.625 11.985,26.625 12.085,26.525 12.985,26.525 v2(14.485,25.025) ; v2(16.185,24.125) 16.185,23.725 v2(19.385,20.525) ; v2(25.085,13.425) 29.785,13.425 30.685,12.525 30.785,12.525 30.885,12.425 34.485,12.425 35.385,11.525 35.585,11.525 35.685,11.425 35.985,11.425 36.285,11.125 36.385,11.125 36.485,11.025 36.785,11.025 36.885,11.125 v2(40.685,11.125) ; v2(48.783,6.705) 68.735,6.705 68.919,6.521 76.776,6.521 77.012,6.757 96.516,6.757 v2(98.417,7.425) ; 61.585,6.705 v2(61.685,6.625) ; v2(67.185,20.625) 67.085,20.525 67.085,17.925 69.185,15.825 69.185,15.725 69.285,15.625 69.285,15.525 69.385,15.425 69.385,14.525 69.285,14.425 69.285,14.325 69.185,14.225 69.185,14.125 67.785,12.725 v2(67.785,12.525)
AAD_CFG_1V8_U7: R18.1 U7.8 | length 15.7
  F.Cu w0.15: U7.8@60.535,28.8 61.685,28.825 62.885,27.625 63.285,27.625 65.985,24.925 66.085,24.925 66.185,24.825 66.485,24.825 66.785,25.125 66.785,25.225 67.385,25.825 67.385,27.125 69.085,28.825 69.085,29.225 69.285,29.425 69.285,30.125 69.085,30.325 68.385,30.325 68.285,30.325 R18.1@68.285,30.925
ACCEL_INT: U1.63 U3.12 | length 5.6
  F.Cu w0.15: U1.63@63.885,45.025 v2(64.485,45.025)
  In5.Cu w0.15: v2(64.485,45.025) 65.335,45.025 65.385,44.975 68.785,44.975 68.835,45.025 68.935,45.025 68.985,45.075 69.035,45.075 69.085,45.125 69.135,45.125 69.185,45.175 69.235,45.175 69.285,45.225 v2@69.335,45.225
  other v2: 69.435,45.288
BLE_DFU_REQ: R76.2 U1.34 U11.39 | length 61.6
  F.Cu w0.15: U1.34@53.685,37.275 53.685,38.152 53.806,38.152 v1(53.993,38.339) ; R76.2@89.51,42.525 90.012,42.525 90.067,42.58 v1(91.517,42.58) ; v1(99.735,34.363) 99.921,34.548 102.185,34.548 U11.39@102.185,35.125
  In3.Cu w0.15: v1(53.993,38.339) 53.993,36.367 55.847,34.513 60.503,34.513 v1(62.442,36.452) ; v1(84.813,37.87) 89.523,42.58 v1(91.517,42.58) v1(99.735,34.363)
  B.Cu w0.15: v1(62.442,36.452) 68.027,36.452 69.445,37.87 v1(84.813,37.87)
BLE_EN: R77.1 U1.5 U6.2 | length 54.2
  F.Cu w0.15: U1.5@47.935,49.025 48.008,49.098 49.558,49.098 v1(49.607,49.05) ; v1(87.345,42.563) 88.358,41.55 88.358,41.275 R77.1@88.86,41.275 88.86,40.748 90.083,39.525 U6.2@92.885,39.525
  In3.Cu w0.15: v1(55.33,47.79) 57.726,45.394 60.168,45.394 65.987,51.213 67.115,51.213 69.001,49.327 80.581,49.327 v1(87.345,42.563)
  B.Cu w0.15: v1(49.607,49.05) 50.867,47.79 v1(55.33,47.79)
BLE_RX_U1: R74.2 U1.45 | length 50.8
  F.Cu w0.15: U1.45@59.185,37.275 59.135,37.325 59.135,38.325 62.135,38.325 62.635,37.825 62.885,37.825 63.635,37.075 64.135,37.075 64.635,36.575 68.635,36.575 68.885,36.325 69.385,36.325 69.885,35.825 96.135,35.825 98.385,33.575 99.135,33.575 99.385,33.825 106.135,33.825 106.135,33.325 106.185,33.275 R74.2@106.26,33.275
BLE_RX_U11: R74.1 U11.22 | length 13.9
  F.Cu w0.15: v1(98.028,40.575) U11.22@98.785,40.575 ; v1(102.765,32.556) 104.389,32.556 105.108,33.275 R74.1@105.61,33.275
  In3.Cu w0.15: v1(98.028,40.575) 102.765,35.838 v1(102.765,32.556)
BLE_TX_U1: R75.1 U1.44 | length 15.2
  F.Cu w0.15: v1(58.685,36.199) U1.44@58.685,37.275 ; R75.1@66.86,42.275 66.86,41.985 67.589,41.256 v1(67.589,38.157)
  B.Cu w0.15: v1(58.685,36.199) 60.642,38.157 v1(67.589,38.157)
BLE_TX_U11: R75.2 U11.24 | length 37.7
  F.Cu w0.15: R75.2@67.51,42.275 68.012,42.275 68.32,41.968 v1(68.32,37.715) ; v1(76.606,38.568) 77.908,37.267 93.139,37.267 93.535,37.663 93.535,37.875 95.379,39.719 95.65,39.719 95.706,39.775 U11.24@98.785,39.775
  B.Cu w0.15: v1(68.32,37.715) 68.936,38.331 76.369,38.331 v1(76.606,38.568)
BOOT0: R2.1 TP_EOL.9 U1.94 | length 18.6
  F.Cu w0.15: U1.94@52.685,52.775 52.635,52.825 52.635,53.825 v1(52.885,53.825) ; R2.1@65.11,43.525 65.135,43.55 65.135,43.575 65.135,44.075 65.385,44.075 v1(65.385,44.325)
  B.Cu w0.1: 62.835,46.375 63.435,46.375 63.585,46.225 63.635,46.225 63.685,46.175 63.935,46.175 64.035,46.275
  B.Cu w0.15: v1(52.885,53.825) 53.885,53.825 54.135,54.075 54.635,54.075 56.635,52.075 TP_EOL.9@56.885,52.075 ; TP_EOL.9@57.435,51.525 58.935,50.025 58.985,50.025 60.435,48.575 60.485,48.575 60.635,48.425 60.685,48.425 62.785,46.325 ; 64.085,46.325 64.685,45.725 64.685,45.625 64.735,45.575 64.735,45.375 64.935,45.175 64.935,45.025 65.085,44.875 ; 65.135,44.825 65.385,44.575 v1(65.385,44.325)
CELL_DBG_RXD_TP: R37.1 TP_CELL_DBG.3 U27.2 | length 41
  F.Cu w0.15: R37.1@43.11,19.525 43.11,18.998 43.904,18.998 44.262,18.64 44.262,17.747 v1(44.065,17.55) ; R37.1@43.185,19.625 43.185,19.825 43.385,20.025 43.385,20.225 43.485,20.325 43.485,20.525 43.785,20.825 43.785,21.025 v2(49.985,27.225) ; U27.2@44.267,10.525 v2(44.267,10.575)
  In3.Cu w0.15: v1(44.065,17.55) 44.435,13.725 43.735,11.925 43.735,11.425 v2(44.267,10.575) ; v2(49.485,38.725) 49.485,37.625 49.585,37.525 49.585,36.725 49.685,36.625 49.685,28.925 49.985,28.625 v2(49.985,27.225) ; v2(51.085,39.625) 53.385,41.925 53.385,42.125 v2(55.285,44.025)
  B.Cu w0.15: v2(49.485,38.725) 49.985,38.725 50.085,38.825 50.285,38.825 v2(51.085,39.625) ; v2(55.285,44.025) TP_CELL_DBG.3@55.585,44.325
CELL_DBG_RXD_U8: R37.2 U8.22 | length 27.5
  F.Cu w0.15: U8.22@23.535,12.025 23.535,11.198 25.703,11.198 v1(25.879,11.022) ; R37.2@43.76,19.525 43.76,20.052 43.832,20.052 v1(44.016,20.236)
  In3.Cu w0.15: v1(25.879,11.022) 37.276,11.022 39.217,12.963 39.217,15.5 43.953,20.236 v1(44.016,20.236)
CELL_DBG_TXD_TP: R36.2 TP_CELL_DBG.2 U27.1 | length 77.1
  F.Cu w0.15: R36.2@14.01,29.275 v1(15.036,29.275) ; U27.1@44.267,11.025 v1(44.267,11.585)
  In3.Cu w0.15: v1(15.036,29.275) 15.576,29.275 16.334,28.517 16.334,27.824 16.685,27.474 16.685,26.279 23.062,19.902 23.062,19.893 31.432,11.523 36.531,11.523 v1(36.626,11.618) ; v1(44.267,11.585) 45.153,12.471 45.153,36.588 50.159,41.594 50.159,43.275 v2(51.585,43.625)
  B.Cu w0.15: v1(36.626,11.618) 44.235,11.618 v1(44.267,11.585) ; v2(51.585,43.625) TP_CELL_DBG.2@53.225,45.025
CELL_DBG_TXD_U8: R36.1 U8.23 | length 24.6
  F.Cu w0.15: R36.1@13.36,29.275 13.36,28.748 15.298,28.748 v1(15.405,28.641) ; v1(21.77,13.033) 21.95,12.852 24.635,12.852 U8.23@24.635,12.025
  In3.Cu w0.15: v1(15.405,28.641) 15.405,19.397 v1(21.77,13.033)
CELL_DBG_VREF_TP: R41.2 U27.4 | length 16.1
  F.Cu w0.15: R41.2@43.76,18.275 43.76,18.058 43.475,17.773 43.475,17.282 45.064,15.693 v1(46.2,15.693) ; U27.4@44.267,9.525 43.708,9.525 43.708,8.796 44.565,7.939 45.323,7.939 v1(45.747,8.363)
  In3.Cu w0.15: v1(45.747,8.363) 46.456,9.072 46.456,15.437 v1(46.2,15.693)
CELL_DTR_U16: R29.1 U1.61 U16.16 | length 51.7
  F.Cu w0.15: v1(20.188,44.803) 20.383,44.998 20.61,44.998 R29.1@20.61,45.525 ; v1(27.926,43.558) 27.926,41.926 29.202,40.65 29.558,40.65 U16.16@30.585,40.65 31.612,40.65 31.612,39.207 v1(32.809,38.01) ; 32.185,38.625 v2(35.985,38.625) ; v2(62.485,43.725) 62.785,44.025 U1.61@62.985,44.025
  In3.Cu w0.15: v2(53.185,40.325) 55.885,43.025 55.985,43.025 56.085,43.125 60.085,43.125 60.185,43.225 60.285,43.225 60.385,43.325 61.985,43.325 62.085,43.425 62.185,43.425 v2(62.485,43.725)
  B.Cu w0.15: v1(20.188,44.803) 20.712,45.327 21.503,45.327 22.83,44 27.484,44 v1(27.926,43.558) ; v2(35.985,38.625) 38.585,38.625 39.285,39.325 43.985,39.325 44.385,39.725 44.485,39.725 44.585,39.825 48.585,39.825 48.885,40.125 52.985,40.125 v2(53.185,40.325)
CELL_PWRKEY_CMD: R24.1 U1.58 | length 108.3
  F.Cu w0.15: R24.1@15.36,40.775 14.858,40.775 14.858,39.147 17.356,36.649 v1(18.698,36.649)
  In3.Cu w0.15: v1@18.685,36.525 18.685,35.925 18.785,35.825 18.785,35.725 18.885,35.625 18.885,35.525 18.985,35.425 18.985,35.325 19.085,35.225 19.085,35.125 19.985,34.225 19.985,33.125 20.085,33.025 20.085,29.025 33.985,15.125 34.085,15.125 34.185,15.025 34.485,15.025 v2(35.885,13.625) ; v2(46.885,14.525) 50.885,14.525 51.185,14.225 51.585,14.225 51.785,14.425 v2(51.885,14.425) ; v2@63.485,42.425 63.485,41.325 63.785,41.025 63.785,40.225 64.285,39.725 64.385,39.725 64.485,39.625 66.885,39.625 v2(67.085,39.425) ; v2(63.685,16.325) 65.285,17.925 v2(67.685,17.925) ; v2(69.085,35.825) 69.885,36.625 69.885,36.725 69.985,36.825 69.985,38.025 v2(70.785,38.825) ; v2(71.685,19.025) 71.585,19.125 71.585,19.725 71.985,20.125 72.085,20.125 72.185,20.225 72.185,20.325 72.285,20.425 72.285,20.525 72.385,20.625 72.385,25.725 72.785,26.125 72.785,26.225 72.885,26.325 72.885,26.425 72.785,26.525 72.785,26.625 72.085,27.325 v2(72.085,29.925)
  B.Cu w0.15: v2(35.885,13.625) 36.685,13.625 36.785,13.725 36.985,13.725 37.085,13.825 37.185,13.825 37.385,14.025 39.985,14.025 40.085,13.925 40.185,13.925 40.285,13.825 40.485,13.825 40.585,13.925 40.685,13.925 41.285,14.525 v2(46.885,14.525) ; v2(51.885,14.425) 53.785,16.325 v2(63.685,16.325) ; v2(67.085,39.425) 70.185,39.425 v2(70.785,38.825) ; v2(67.685,17.925) 67.885,18.125 67.985,18.125 68.885,19.025 v2(71.685,19.025) ; v2(69.085,35.825) 69.085,34.525 70.085,33.525 70.085,32.725 71.085,31.725 71.085,31.625 71.185,31.525 71.185,30.825 v2(72.085,29.925)
  other v2: 63.435,42.525
CELL_RESET_N_CMD: R26.1 U1.59 | length 53.7
  F.Cu w0.15: R26.1@17.11,40.775 16.649,41.236 16.649,42.64 17.367,43.358 18.467,43.358 v1(18.521,43.413) ; v1(51.737,41.548) 52.477,42.288 v1(52.477,42.584) ; U1.59@63.435,43.025 64.312,43.025 64.313,43.026 v1(64.491,43.026)
  B.Cu w0.15: v1(18.521,43.413) 20.836,43.413 21.062,43.186 27.055,43.186 28.387,41.855 43.844,41.855 44.567,41.131 47.335,41.131 47.685,41.475 48.685,41.475 49.035,41.131 51.321,41.131 v1(51.737,41.548) ; v1(52.477,42.584) 53.166,43.273 64.244,43.273 v1(64.491,43.026)
CELL_RF: C79.1 R43.1 U8.60 | length 33.1
  F.Cu w0.151: U8.60@22.41,34.05 22.41,27.925 22.535,27.8 22.535,21.738 22.847,21.425 22.91,21.425 22.972,21.362 23.91,21.362 24.16,21.113 24.16,21.05 24.222,20.988 24.222,18.238 24.16,18.175 24.16,18.113 23.535,17.488 23.535,15.175 23.847,14.863 23.972,14.863 24.035,14.8 24.16,14.8 25.097,13.863 25.222,13.863 26.285,12.8 26.285,12.738 26.347,12.675 26.347,12.613 26.41,12.55 26.41,8.863 27.91,7.362 27.91,7.175 28.035,7.05 28.16,7.05 28.66,6.55 28.722,6.55 28.785,6.488 29.472,6.488 29.66,6.675 29.66,6.925 R43.1@29.785,7.05
CELL_RF_ANT: C80.1 D3.1 J8.1 R43.2 | length 18.4
  F.Cu w0.151: J8.1@18.66,3.55 21.035,3.55 24.222,6.737 ; D3.1@24.222,7.05 24.222,6.737 ; 25.035,6.737 25.722,6.05 25.722,5.988 25.972,5.738 26.097,5.738 26.16,5.675 27.535,5.675 27.597,5.738 27.722,5.738 28.035,6.05 29.66,6.05 29.722,6.112 29.785,6.112 30.66,6.988 31.035,6.988 31.035,7.113 30.597,7.113 30.222,7.488 30.16,7.488 30.097,7.55 29.972,7.55 29.91,7.613 29.597,7.613 29.535,7.55 29.41,7.55 29.097,7.238 R43.2@29.097,7.05 ; C80.1@25.598,7.05 25.347,7.05 24.973,6.675 24.91,6.675 24.847,6.613 24.41,6.613 24.348,6.675 24.285,6.675 24.222,6.737
CELL_RI_U16: R33.2 U1.62 U16.19 | length 48.9
  F.Cu w0.1: v2(61.185,42.875) 61.185,42.925 62.785,44.525 U1.62@62.985,44.525
  F.Cu w0.15: R33.2@21.26,40.775 21.26,41.322 21.836,41.897 21.836,42.523 21.837,42.524 21.837,43.606 v1(22.144,43.913) ; U16.19@30.585,42.6 32.782,42.6 v1(32.804,42.622)
  In5.Cu w0.1: v1@32.885,42.475 32.935,42.425 46.835,42.425 46.885,42.475 46.985,42.475 47.785,43.275 51.685,43.275 51.735,43.325 51.785,43.325 52.135,43.675 55.385,43.675 55.435,43.725 55.485,43.725 55.835,44.075 56.335,44.075 56.385,44.025 56.435,44.025 57.235,43.225 60.585,43.225 60.635,43.175 60.735,43.175 61.035,42.875 v2(61.185,42.875)
  B.Cu w0.15: v1(22.144,43.913) 22.517,43.54 27.199,43.54 28.117,42.622 v1(32.804,42.622)
CELL_RX_U16: R32.2 U1.93 U16.21 | length 41.1
  F.Cu w0.15: R32.2@21.135,46.825 22.135,47.825 22.135,48.325 22.635,48.325 23.385,47.575 24.385,47.575 24.635,47.325 25.135,47.325 28.635,43.825 U16.21@30.635,43.825 ; U16.21@30.585,43.9 30.635,43.85 U16.21@30.635,43.825 ; U1.93@53.135,52.825 53.135,51.825 52.385,51.075 50.135,51.075 49.385,51.825 49.135,51.825 48.635,52.325 47.635,52.325 47.635,52.075 47.135,52.075 46.635,51.575 41.135,51.575 37.385,47.825 37.385,46.575 34.885,44.075 31.885,44.075 31.635,43.825 U16.21@30.635,43.825
CELL_STATUS_U16: R34.1 U1.60 U16.20 | length 58
  F.Cu w0.1: v2(62.035,42.875) 62.085,42.925 62.135,42.925 62.185,42.975 62.235,42.975 62.285,43.025 62.385,43.025 62.435,43.075 62.485,43.075 62.735,43.325 62.785,43.325 U1.60@62.985,43.525
  F.Cu w0.15: v1(18.307,38.905) 18.4,38.998 18.86,38.998 R34.1@18.86,39.525 ; U16.20@30.585,43.25 33.43,43.25 v1(35.916,40.764)
  In3.Cu w0.1: v2(55.185,41.075) 55.235,41.075 55.485,41.325 55.535,41.325 55.585,41.375 57.985,41.375 58.085,41.475 58.985,41.475 59.035,41.525 59.085,41.525 59.135,41.575 60.185,41.575 60.235,41.625 60.285,41.625 61.185,42.525 61.285,42.525 61.335,42.575 61.385,42.575 61.435,42.625 61.485,42.625 61.535,42.675 61.585,42.675 61.635,42.725 61.685,42.725 61.735,42.775 61.835,42.775 61.885,42.825 61.935,42.825 61.985,42.875 v2(62.035,42.875)
  In5.Cu w0.1: v1@36.085,40.825 40.985,40.825 41.835,41.675 41.935,41.675 41.985,41.725 42.385,41.725 42.435,41.775 42.485,41.775 42.535,41.825 44.535,41.825 44.785,42.075 44.835,42.075 44.885,42.125 46.685,42.125 46.735,42.175 48.235,42.175 48.785,41.625 48.835,41.625 48.885,41.575 51.035,41.575 51.485,41.125 51.535,41.125 51.585,41.075 v2(55.185,41.075)
  B.Cu w0.15: v1(18.307,38.905) 18.802,38.905 21.643,41.746 21.804,41.746 22.633,42.576 23.887,42.576 27.743,38.72 33.963,38.72 35.916,40.673 v1(35.916,40.764)
CELL_TX_U16: R28.2 U1.92 U16.17 | length 60.9
  F.Cu w0.15: v1(21.147,38.808) 21.26,38.921 R28.2@21.26,39.525 ; v1(29.366,41.3) U16.17@30.585,41.3 ; v1(35.365,35.292) v1(41.882,35.292) ; v1(41.307,47.582) 44.819,51.094 46.653,51.094 47.03,51.471 49.225,51.471 49.99,50.706 52.513,50.706 53.685,51.878 U1.92@53.685,52.775
  In3.Cu w0.15: v1(21.147,38.808) 21.147,39.042 21.627,39.521 22.363,39.521 24.877,42.035 24.877,42.159 26.574,43.856 27.478,43.856 27.708,44.085 28.144,44.085 29.366,42.863 v1(29.366,41.3) 30.091,40.575 30.091,39.126 31.277,37.94 31.277,35.167 31.793,34.652 34.725,34.652 v1(35.365,35.292) ; v1(41.307,47.582) 41.307,41.153 41.882,40.577 v1(41.882,35.292)
CELL_USB_BOOT_1V8: R35.1 R38.2 U8.75 | length 16.4
  F.Cu w0.112: 41.36,16.5 41.86,16.5 42.01,16.35
  F.Cu w0.15: U8.75@33.635,22.175 34.412,22.175 37.119,22.175 38.651,20.643 v1(38.651,15.134) ; v1(39.855,15.393) 39.855,15.709 40.645,16.5 41.36,16.5 R35.1@41.36,17.025 ; R38.2@42.01,15.775 42.01,16.35
  B.Cu w0.15: v1(38.651,15.134) 39.596,15.134 v1(39.855,15.393)
CELL_USB_BOOT_TP: R38.1 TP_CELL_DBG.4 U27.5 | length 70.8
  F.Cu w0.15: v1(40.681,15.775) R38.1@41.36,15.775 ; R38.1@41.385,15.725 41.385,15.625 41.485,15.525 41.485,15.425 41.685,15.225 v2(42.385,15.225) ; U27.5@44.267,9.025 v1(44.827,8.465)
  In3.Cu w0.15: v2(38.085,42.825) 38.085,41.925 38.385,41.625 38.385,41.525 38.485,41.425 38.485,40.825 40.285,39.025 40.285,29.925 v2(40.685,29.525) ; v1(40.681,15.775) 40.681,15.475 39.839,14.633 39.839,6.912 40.355,6.395 42.757,6.395 v1(44.827,8.465) ; v2(42.385,15.225) 42.385,15.825 43.285,16.725 43.285,16.825 43.385,16.925 43.385,18.825 v2(44.585,20.025) ; v2(46.885,44.425) 46.985,44.425 47.985,45.425 49.985,45.425 v2(50.785,46.225)
  B.Cu w0.15: v2(38.085,42.825) 45.285,42.825 v2(46.885,44.425) ; v2(40.685,29.525) 44.385,25.825 44.385,20.625 44.585,20.425 v2(44.585,20.025) ; v2(50.785,46.225) 53.385,46.225 53.485,46.125 53.685,46.125 53.785,46.025 55.185,46.025 55.285,46.125 55.485,46.125 55.585,46.225 55.985,46.225 56.085,46.125 56.285,46.125 56.985,45.425 57.185,45.425 57.285,45.325 57.385,45.325 TP_CELL_DBG.4@57.585,45.125
CELL_USB_DM_TP: R40.2 TP_CELL_USB.3 U26.2 | length 77.3
  F.Cu w0.154: U26.2@11.76,23.175 v1(12.385,22.384) 13.36,22.384 R40.2@13.36,23.025
  B.Cu w0.154: v1(12.385,22.384) 12.385,21.825 10.185,21.825 10.185,24.579 10.115,24.579 10.115,53.225 34.042,53.225 34.042,49.525 42.185,49.525 42.485,46.525 TP_CELL_USB.3@41.765,45.025
CELL_USB_DM_U8: R40.1 U8.10 | length 4.8
  F.Cu w0.154: R40.1@14.01,23.025 14.71,23.344 17.835,23.344 U8.10@18.535,22.825
CELL_USB_DP_TP: R39.2 TP_CELL_USB.2 U26.1 | length 77.3
  F.Cu w0.154: U26.1@11.76,23.875 v1(11.885,24.875) 13.36,24.875 R39.2@13.36,24.275
  B.Cu w0.154: v1(11.885,24.875) 10.472,25.025 10.472,39.025 14.257,39.025 14.257,43.025 10.472,43.025 10.472,52.868 33.685,52.868 33.685,49.168 39.685,49.168 40.185,46.525 TP_CELL_USB.2@39.225,45.025
CELL_USB_DP_U8: R39.1 U8.9 | length 4.8
  F.Cu w0.154: R39.1@14.01,24.275 14.71,23.701 17.835,23.701 U8.9@18.535,23.925
CELL_USB_VBUS: D10.1 TP_CELL_USB.1 U8.8 | length 61.7
  F.Cu w0.3: U8.8@18.535,25.025 v1(20.737,25.025) ; D10.1@41.445,21.025 v1(41.445,21.711)
  In3.Cu w0.3: v1(20.737,25.025) 23.341,25.025 35.704,12.663 38.238,12.663 38.696,13.121 38.696,14.239 38.05,14.885 38.05,18.315 v1(41.445,21.711) 41.256,21.9 41.256,40.336 v1(37.561,44.032)
  B.Cu w0.3: TP_CELL_USB.1@36.685,45.025 36.685,44.908 v1(37.561,44.032)
CELL_USIM_CLK_1V8: U8.46 U13.7 | length 43.6
  F.Cu w0.15: v2(35.185,32.725) 35.185,30.425 35.285,30.325 35.285,30.225 35.485,30.025 35.685,30.025 35.785,29.925 36.085,29.925 36.185,29.825 36.985,29.825 37.085,29.725 v1@37.785,29.725 ; v2(35.785,47.025) 35.785,47.125 35.685,47.225 35.685,47.725 36.085,48.125 36.085,50.425 36.185,50.525 v2(36.185,50.825) ; U8.46@36.835,29.425 37.662,29.425 37.662,29.448 v1(37.837,29.623) ; U13.7@37.285,56.7 38.312,56.7 38.837,57.225 40.554,57.225 40.861,56.918 40.861,56.418 39.595,55.152 v1(39.595,55.129)
  In3.Cu w0.15: v2(35.185,32.725) 35.185,33.725 35.085,33.825 35.085,34.225 35.885,35.025 35.885,35.125 35.985,35.225 35.985,36.725 35.285,37.425 35.285,39.525 34.485,40.325 34.485,44.025 34.585,44.125 34.585,44.225 35.685,45.325 35.685,45.425 35.785,45.525 v2(35.785,47.025) ; v2(36.185,50.825) 36.285,50.925 36.285,51.625 36.085,51.825 36.085,51.925 35.985,52.025 35.985,52.125 35.785,52.325 35.785,52.425 35.685,52.525 35.685,52.625 35.585,52.725 35.585,52.825 35.385,53.025 35.385,53.125 35.285,53.225 35.285,53.325 35.085,53.525 35.085,53.625 34.985,53.725 34.985,53.825 34.885,53.925 34.885,55.225 34.785,55.325 34.885,55.425 34.885,55.525 35.185,55.825 35.285,55.825 35.385,55.925 35.485,55.925 36.085,56.525 36.185,56.525 36.285,56.625 36.485,56.625 36.685,56.425 36.785,56.425 36.885,56.325 36.985,56.325 37.085,56.225 37.185,56.225 37.285,56.125 37.485,56.125 37.585,56.025 37.685,56.025 37.785,55.925 37.885,55.925 37.985,55.825 38.085,55.825 38.185,55.725 38.285,55.725 38.385,55.625 38.585,55.625 38.685,55.525 38.785,55.525 38.885,55.425 38.985,55.425 39.085,55.325 39.185,55.325 39.285,55.225 39.385,55.225 v1@39.485,55.125
CELL_USIM_DATA_1V8: U8.45 U13.10 | length 33.1
  F.Cu w0.15: v1(33.685,54.438) 33.997,54.75 U13.10@37.285,54.75 ; v1(34.196,47.517) 34.196,50.073 v1(34.82,50.697) ; v1(35.831,28.502) 36.008,28.325 U8.45@36.835,28.325 ; v1(35.848,37.633) 36.47,38.256 36.47,43.293 v1(35.848,43.916)
  B.Cu w0.15: v1(33.685,54.438) 34.82,53.303 v1(34.82,50.697) ; v1(34.196,47.517) 34.196,45.567 v1(35.848,43.916) ; v1(35.831,28.502) 36.349,29.02 36.349,37.131 v1(35.848,37.633)
CELL_USIM_RST_1V8: U8.44 U13.6 | length 46.1
  F.Cu w0.15: v1(32.804,57.79) 33.386,58.372 34.146,58.372 34.52,57.998 35.722,57.998 36.258,57.462 36.258,57.35 U13.6@37.285,57.35 ; v1(36.217,47.433) 38.161,49.377 v1(38.161,51.161) ; U8.44@36.835,27.225 39.081,27.225 v1(42.105,30.249) ; v1(37.401,43.137) 37.401,38.092 v1(37.758,37.735)
  B.Cu w0.15: v1(32.804,57.79) 32.804,56.349 35.579,53.575 36.799,53.575 38.098,52.276 38.098,51.224 v1(38.161,51.161) ; v1(36.217,47.433) 38.087,45.562 38.087,43.756 37.469,43.137 v1(37.401,43.137) ; v1(37.758,37.735) 42.105,33.388 v1(42.105,30.249)
CELL_USIM_VDD_1V8: U8.43 U13.4 U13.9 U13.12 | length 41.3
  F.Cu w0.3: U8.43@36.835,26.125 v1(37.837,26.125) ; U13.12@37.285,53.45 v1(38.703,53.45) 38.703,55.346 ; U13.9@37.285,55.4 38.387,55.4 38.44,55.346 38.703,55.346 ; U13.4@37.285,58.65 38.278,58.65 v1(38.768,59.14) ; v1(40.307,56.698) 38.955,55.346 38.703,55.346
  In3.Cu w0.3: v1(37.837,26.125) 36.799,27.163 36.799,46.918 38.763,48.881 38.763,53.39 v1(38.703,53.45) ; v1(38.768,59.14) 38.768,58.767 40.307,57.228 v1(40.307,56.698)
EN_AUX: J_PWR.10 U1.86 | length 48
  F.Cu w0.15: v1(52.622,54.821) 52.703,54.902 54.865,54.902 56.115,53.652 56.685,53.652 U1.86@56.685,52.775
  In3.Cu w0.15: J_PWR.10@15.605,54.525 20.584,59.504 21.746,59.504 22.764,60.522 47.651,60.522 50.994,57.178 51.399,57.178 51.913,56.664 51.913,56.212 52.622,55.503 v1(52.622,54.821)
EN_MODEM: J_PWR.9 U1.85 | length 44.5
  F.Cu w0.15: J_PWR.9@15.605,51.525 24.785,51.525 43.835,52.925 45.785,53.625 v1(48.735,53.175) ; v1(55.885,51.075) 56.885,51.075 57.135,51.325 U1.85@57.135,52.825
  B.Cu w0.15: v1(48.735,53.175) 51.985,53.175 52.535,53.025 52.885,52.675 53.435,51.475 53.835,51.025 54.385,50.875 v1(55.885,51.075)